# Altium PCB STM32H743I-EVAL2PCBDESIGN.PcbDoc (part 4 of 23)
Units mil, origin at the board's own origin, x right, y up, seen from the top; angles counter-clockwise.
Board outline 6558 x 5417 mil, 8 copper layers (L1_TOP, L2_GND, L3_HS1, L4_POWER, L5_SIG, L6_HS2, L7_GND, L8_BOTTOM), stack 61.368 mil thick; 620 components, 588 nets, 2945 pads, 1724 vias.
Unrouted connection lines stored in the file: 1.
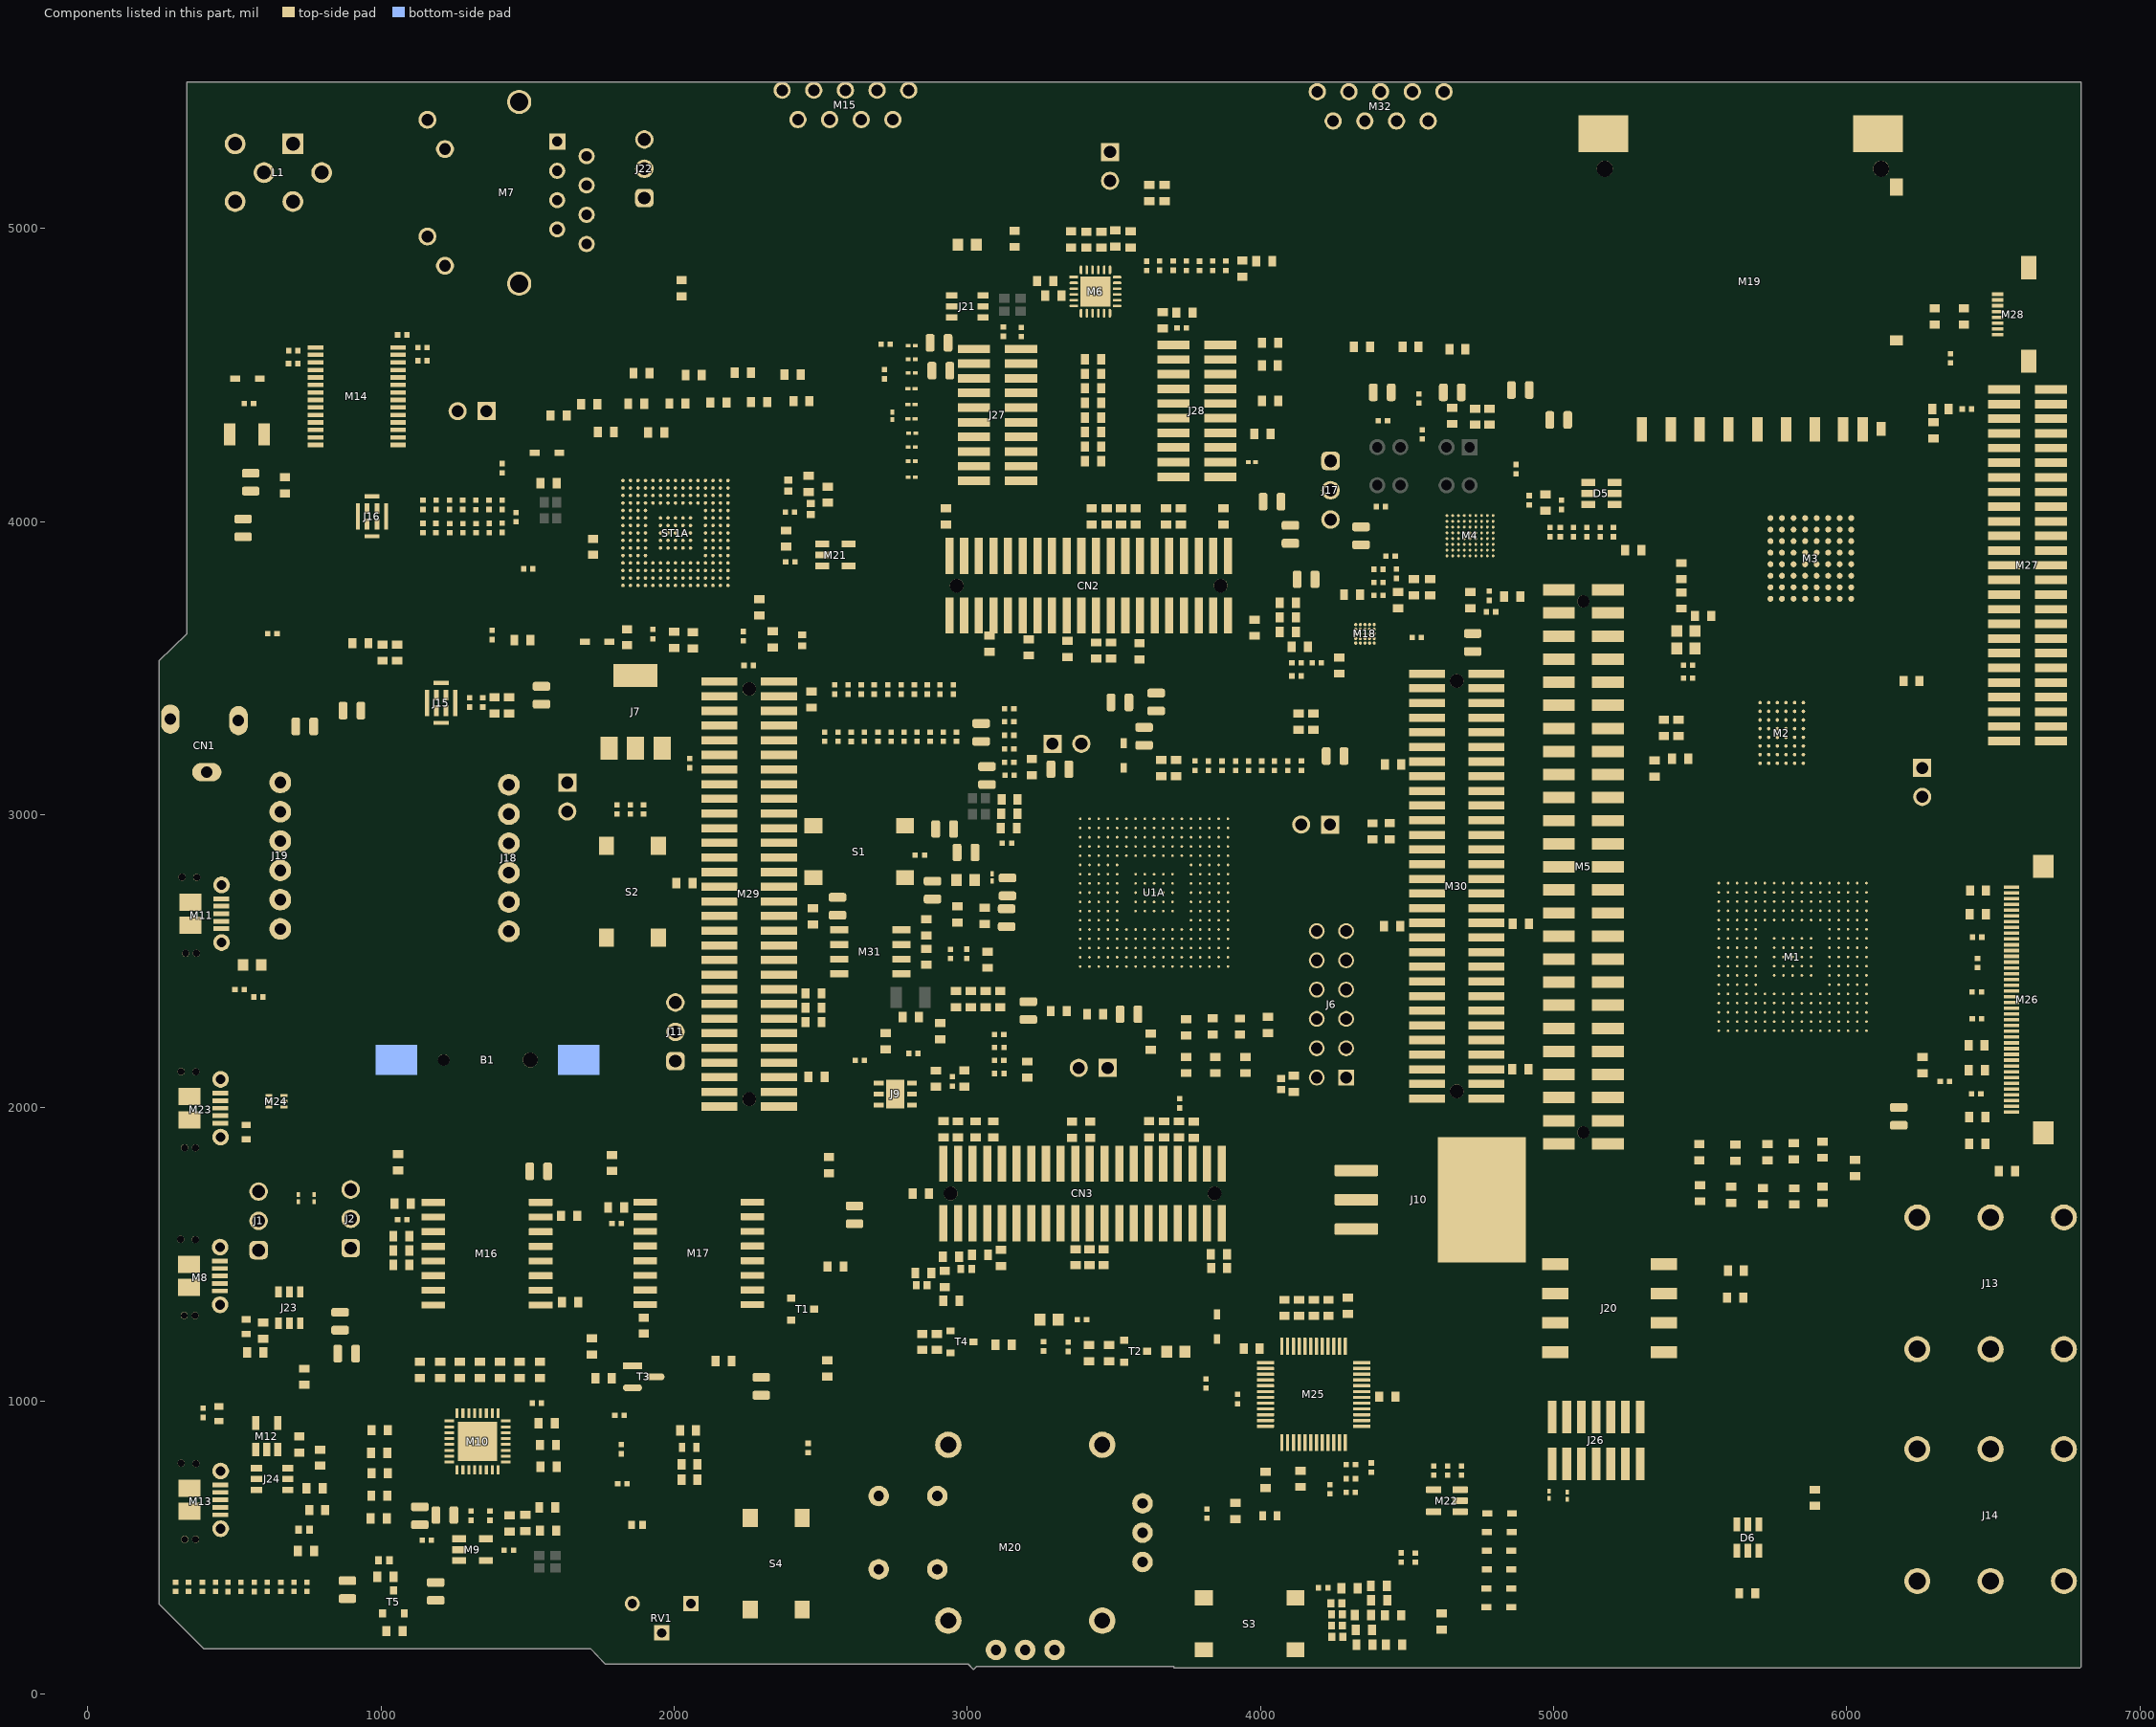
[diagram p8: the components of this part, seen from the top]

## Part data (continued)
CN1: library part PJ-102A, "2.0 x 6.5 mm, 2.5 A, Horizontal, Through Hole, Tapered Pins, Dc Power Jack Connector", Current Rating=2.5A, Manufacturer="Same Sky", Max Operating Temperature=85°C, Min Operating Temperature=-25°C, Supplier Part Number=CP-102A-ND, Voltage Rating=24V, Category="Power Connectors", ComponentLink1Description=https://datasheet.octopart.com:443/PJ-102A-Same-Sky-datasheet-184712293.pdf?src-supplier=Same+Sky, ComponentLink1URL=https://datasheet.octopart.com:443/PJ-102A-Same-Sky-datasheet-184712293.pdf?src-supplier=Same+Sky, ComponentLink2Description=https://datasheet.octopart.com:443/PJ-102A-Same-Sky-datasheet-181917428.pdf?src-supplier=Same+Sky, ComponentLink2URL=https://datasheet.octopart.com:443/PJ-102A-Same-Sky-datasheet-181917428.pdf?src-supplier=Same+Sky, ComponentLink3Description=https://datasheet.octopart.com:443/PJ-102A-CUI-Devices-datasheet-175924906.pdf?src-supplier=Same+Sky, ComponentLink3URL=https://datasheet.octopart.com:443/PJ-102A-CUI-Devices-datasheet-175924906.pdf?src-supplier=Same+Sky, ComponentLink4Description=https://datasheet.octopart.com:443/PJ-102A-CUI-Devices-datasheet-137942634.pdf?src-supplier=Same+Sky, ComponentLink4URL=https://datasheet.octopart.com:443/PJ-102A-CUI-Devices-datasheet-137942634.pdf?src-supplier=Same+Sky, ComponentLink5Description=https://datasheet.octopart.com:443/PJ-102A-CUI-Devices-datasheet-180437676.pdf?src-supplier=IHS, ComponentLink5URL=https://datasheet.octopart.com:443/PJ-102A-CUI-Devices-datasheet-180437676.pdf?src-supplier=IHS, ComponentLink6Description=https://datasheet.octopart.com:443/PJ-102A-Same-Sky-datasheet-190142001.pdf?src-supplier=element14+APAC, ComponentLink6URL=https://datasheet.octopart.com:443/PJ-102A-Same-Sky-datasheet-190142001.pdf?src-supplier=element14+APAC, ComponentLink7Description=https://datasheet.octopart.com:443/PJ-102A-Same-Sky-datasheet-182881007.pdf?src-supplier=Electro+Sonic, ComponentLink7URL=https://datasheet.octopart.com:443/PJ-102A-Same-Sky-datasheet-182881007.pdf?src-supplier=Electro+Sonic, ComponentLink8Description=https://datasheet.octopart.com:443/PJ-102A-CUI-Devices-datasheet-175925641.pdf?src-supplier=Master+Electronics, ComponentLink8URL=https://datasheet.octopart.com:443/PJ-102A-CUI-Devices-datasheet-175925641.pdf?src-supplier=Master+Electronics, ComponentLink9Description=https://datasheet.octopart.com:443/PJ-102A-CUI-Devices-datasheet-141000397.pdf?src-supplier=Master+Electronics, ComponentLink9URL=https://datasheet.octopart.com:443/PJ-102A-CUI-Devices-datasheet-141000397.pdf?src-supplier=Master+Electronics, ComponentLink10Description=https://datasheet.octopart.com:443/PJ-102A-CUI-Devices-datasheet-103112348.pdf?src-supplier=Master+Electronics, ComponentLink10URL=https://datasheet.octopart.com:443/PJ-102A-CUI-Devices-datasheet-103112348.pdf?src-supplier=Master+Electronics, ComponentLink11Description=https://datasheet.octopart.com:443/PJ-102A-Same-Sky-datasheet-189105345.pdf?src-supplier=Master+Electronics, ComponentLink11URL=https://datasheet.octopart.com:443/PJ-102A-Same-Sky-datasheet-189105345.pdf?src-supplier=Master+Electronics, ComponentLink12Description=https://datasheet.octopart.com:443/PJ-102A-Same-Sky-datasheet-182049957.pdf?src-supplier=Future+Electronics, ComponentLink12URL=https://datasheet.octopart.com:443/PJ-102A-Same-Sky-datasheet-182049957.pdf?src-supplier=Future+Electronics, ComponentLink13Description=https://datasheet.octopart.com:443/PJ-102A-CUI-Devices-datasheet-175923576.pdf?src-supplier=Future+Electronics, ComponentLink13URL=https://datasheet.octopart.com:443/PJ-102A-CUI-Devices-datasheet-175923576.pdf?src-supplier=Future+Electronics, ComponentLink14Description=https://datasheet.octopart.com:443/PJ-102A-CUI-Devices-datasheet-137760698.pdf?src-supplier=Future+Electronics, ComponentLink14URL=https://datasheet.octopart.com:443/PJ-102A-CUI-Devices-datasheet-137760698.pdf?src-supplier=Future+Electronics, ComponentLink15Description=https://datasheet.octopart.com:443/PJ-102A-CUI-Devices-datasheet-175927751.pdf?src-supplier=CUI+Devices+SCT, ComponentLink15URL=https://datasheet.octopart.com:443/PJ-102A-CUI-Devices-datasheet-175927751.pdf?src-supplier=CUI+Devices+SCT, ComponentLink16Description=https://datasheet.octopart.com:443/PJ-102A-CUI-Devices-datasheet-142371189.pdf?src-supplier=CUI+Devices+SCT, ComponentLink16URL=https://datasheet.octopart.com:443/PJ-102A-CUI-Devices-datasheet-142371189.pdf?src-supplier=CUI+Devices+SCT, ComponentLink17Description=https://octopart.com:443/opatz8j6/c1?t=-WF0T8sMxw7ZEMEUunYG0IGxKP0Yt_0ojUryTbX8oeEBMFzh7OEzvQ5wQ2oF7zRzJvMED2rYXCKHmgLGzpfqOZ8OAseJ3yb9j17F6kt0M6N8bppkurbud4uWSQiMY7p_M18UnyrmhLVNgvzFZ1aM8roWuABv1Z9PeQascFjjxp9w9dz_8rujgdZPrO9VPqPVryE0O_anSqoBvbz1cF4h_TZdQxegGvHhOW1RkBmlz1HnuA1vdZdAuZE1KP9yVeIohwCGcBivLgE_DLXZ4t2EhFAMCzvNBNZlDcn7hxFATuDh7xdDrbzepbH8VYiuF8uFnjZGJEdYMCOlNmv2cjiC_a3ntD-4&src-supplier=Compliance+Statements, ComponentLink17URL=https://octopart.com:443/opatz8j6/c1?t=-WF0T8sMxw7ZEMEUunYG0IGxKP0Yt_0ojUryTbX8oeEBMFzh7OEzvQ5wQ2oF7zRzJvMED2rYXCKHmgLGzpfqOZ8OAseJ3yb9j17F6kt0M6N8bppkurbud4uWSQiMY7p_M18UnyrmhLVNgvzFZ1aM8roWuABv1Z9PeQascFjjxp9w9dz_8rujgdZPrO9VPqPVryE0O_anSqoBvbz1cF4h_TZdQxegGvHhOW1RkBmlz1HnuA1vdZdAuZE1KP9yVeIohwCGcBivLgE_DLXZ4t2EhFAMCzvNBNZlDcn7hxFATuDh7xdDrbzepbH8VYiuF8uFnjZGJEdYMCOlNmv2cjiC_a3ntD-4&src-supplier=Compliance+Statements, ComponentLink18Description=https://octopart.com:443/opatz8j6/c1?t=lyDUh_qruL8vgWjpDY0KKH2CtWWc6dlzeBk5P2dQyiXtq9Y2eSRQ4w2SeffFeyNMAgU8S-1KL4yqldB-C-vOmkaRL93H8iYUZOfkDXFCyzrXyvYBlAPBl_LhZxhLQm8qUURGIUMzRwjiqq8UmUCclUmZ7fGkOUNp9q4-4o5nw8B7GTL2ll3kLVZ8Le9fQjCqhP5ynE6Niv_4rvp-t6Mf04GrG4xMvKFGRQXPrAF2WBA0qoirwf4qsfsiR40k2bgGowc35B1kWWo5x3WLNrL2hlbeGbH9PjGwaxTHZuUgy3hOjcfOu4X-01RnGaLVY6UUYiwk2OzDVnbYc9S-e4bOBtrgSdj_qTEg1w&src-supplier=Compliance+Statements, ComponentLink18URL=https://octopart.com:443/opatz8j6/c1?t=lyDUh_qruL8vgWjpDY0KKH2CtWWc6dlzeBk5P2dQyiXtq9Y2eSRQ4w2SeffFeyNMAgU8S-1KL4yqldB-C-vOmkaRL93H8iYUZOfkDXFCyzrXyvYBlAPBl_LhZxhLQm8qUURGIUMzRwjiqq8UmUCclUmZ7fGkOUNp9q4-4o5nw8B7GTL2ll3kLVZ8Le9fQjCqhP5ynE6Niv_4rvp-t6Mf04GrG4xMvKFGRQXPrAF2WBA0qoirwf4qsfsiR40k2bgGowc35B1kWWo5x3WLNrL2hlbeGbH9PjGwaxTHZuUgy3hOjcfOu4X-01RnGaLVY6UUYiwk2OzDVnbYc9S-e4bOBtrgSdj_qTEg1w&src-supplier=Compliance+Statements, ComponentLink19Description=https://octopart.com:443/opatz8j6/c1?t=MX50ZQ27usZ1VxyD64vtWuf1x5tTWh6F3_iRm8YsNBPZ3TY-RrHEHdvDhJxi5UpjlMh8i4bmZmEGPAUjLwa4lqmyce-7MTq-ZvaRW5pn234M0TG_mcIxVK-OqJeyQhim8KYk0XUkNHsspGqmdyslYYzUMiOyt7QwL4Ot-n6vBREdxxelS0PWZElcwtgiBtCki3KKuhbe8WbnnxWORkz0YnWONv3K2abevKLmNLsLM9defrcVQ6szAvcbWWMUqZlpy30zguDfA8WqSXd8kkt6_HsNVRXM7Cis3zZl-TqTGJ9QxoAvJvlt058ADETxR_dSbO61_SOvTk4UwzmRl2tF1SzK5TXb&src-supplier=Compliance+Statements, ComponentLink19URL=https://octopart.com:443/opatz8j6/c1?t=MX50ZQ27usZ1VxyD64vtWuf1x5tTWh6F3_iRm8YsNBPZ3TY-RrHEHdvDhJxi5UpjlMh8i4bmZmEGPAUjLwa4lqmyce-7MTq-ZvaRW5pn234M0TG_mcIxVK-OqJeyQhim8KYk0XUkNHsspGqmdyslYYzUMiOyt7QwL4Ot-n6vBREdxxelS0PWZElcwtgiBtCki3KKuhbe8WbnnxWORkz0YnWONv3K2abevKLmNLsLM9defrcVQ6szAvcbWWMUqZlpy30zguDfA8WqSXd8kkt6_HsNVRXM7Cis3zZl-TqTGJ9QxoAvJvlt058ADETxR_dSbO61_SOvTk4UwzmRl2tF1SzK5TXb&src-supplier=Compliance+Statements, ComponentLink20Description=https://octopart.com:443/opatz8j6/c1?t=5rpHqBocvOB8XETbdsaMT4GCschriLAbhsG7vJx1FlT8pBaX9iKLRk6_djNufPc8GbbK6GpUuau5DG13XQUYV21dqMdXNjQvh_aki5DezZmrMYht9EAvs-13CUEhlXsPKy8wn65mCshOJBhoF3j0qHXVBLctBvCgYs-NCYFeoCo82jHuZfZcLQhZqTWEr9MiSGXAp2yXBA9aQQkIS9heuOTPl2Xc5-Dpk6yEhoM21vz2YOp4cO-bRCz9NbrCyZ3GNzS48IIclIbWkup4Hr-2Vj8lAXYqtTWRShOCzDSQmNs71j2OYaC5ZUAsJeky8ABPYqCo5WYhqzkkssJsDXk0AAofsDmOPcr_rg&src-supplier=Compliance+Statements, ComponentLink20URL=https://octopart.com:443/opatz8j6/c1?t=5rpHqBocvOB8XETbdsaMT4GCschriLAbhsG7vJx1FlT8pBaX9iKLRk6_djNufPc8GbbK6GpUuau5DG13XQUYV21dqMdXNjQvh_aki5DezZmrMYht9EAvs-13CUEhlXsPKy8wn65mCshOJBhoF3j0qHXVBLctBvCgYs-NCYFeoCo82jHuZfZcLQhZqTWEr9MiSGXAp2yXBA9aQQkIS9heuOTPl2Xc5-Dpk6yEhoM21vz2YOp4cO-bRCz9NbrCyZ3GNzS48IIclIbWkup4Hr-2Vj8lAXYqtTWRShOCzDSQmNs71j2OYaC5ZUAsJeky8ABPYqCo5WYhqzkkssJsDXk0AAofsDmOPcr_rg&src-supplier=Compliance+Statements, Export Control Classification Number (ECCN) Code=EAR99, Harmonized Tariff Schedule (HTS) Code=8536.69.40.20, Inside Diameter=2mm, Introduction Date=2024-10-09, Lifecycle Status=Production, Manufacturer Part Number=PJ-102A, Mounting Technology="Through Hole", Number of Conductors=2, Orientation=Horizontal, Outside Diameter=6.5mm, Pins=2, Pricing="1=0.62, 10=0.526, 25=0.4932, 50=0.4698, 200=0.4259, 400=0.40553, 600=0.39408, 1000=0.38011, 2600=0.35532 (USD)", REACH SVHC=Yes, RoHS=Compliant, Schedule B="8536695050, 8536695050|8536695050, 8536695050|8536695050|8536695050, 8536695050|8536695050|8536695050|8536695050", Shielding=Unshielded, Stock=17846, Supplier=DigiKey, Termination=Solder, Voltage Rating (DC)=24V
CN2 CN3: "Pin Header, Board-to-Board, 3.8 A, 2 Rows, 40 Contacts, Surface Mount, FTR Series, Unshrouded", Manufacturer=Samtec, Manufacturer Lifecycle Status=PRODUCTION, Supplier Part Number=FTR-120-03-L-D-LC-ND, Category="Board to Board Connectors", ComponentLink1Description=https://datasheet.octopart.com:443/FTR-120-03-L-D-LC-Samtec-datasheet-97028732.pdf?src-supplier=Samtec, ComponentLink1URL=https://datasheet.octopart.com:443/FTR-120-03-L-D-LC-Samtec-datasheet-97028732.pdf?src-supplier=Samtec, ComponentLink2Description=https://sigma.octopart.com:443/97028733/technical_drawing/Samtec-FTR-120-03-L-D-LC.pdf?src-supplier=Samtec, ComponentLink2URL=https://sigma.octopart.com:443/97028733/technical_drawing/Samtec-FTR-120-03-L-D-LC.pdf?src-supplier=Samtec, ComponentLink3Description=https://datasheet.octopart.com:443/FTR-120-03-L-D-LC-Samtec-datasheet-118235237.pdf?src-supplier=Electro+Sonic, ComponentLink3URL=https://datasheet.octopart.com:443/FTR-120-03-L-D-LC-Samtec-datasheet-118235237.pdf?src-supplier=Electro+Sonic, ComponentLink4Description=https://datasheet.octopart.com:443/FTR-120-03-L-D-LC-Samtec-datasheet-151312691.pdf?src-supplier=Sager+Electronics, ComponentLink4URL=https://datasheet.octopart.com:443/FTR-120-03-L-D-LC-Samtec-datasheet-151312691.pdf?src-supplier=Sager+Electronics, Lifecycle Status=Production, Manufacturer Part Number=FTR-120-03-L-D-LC, Pricing="23=8.03739 (USD)", RoHS=Compliant, Supplier=DigiKey
D1 D3 D4 D14 D16 D17 D18 D19 D20 D21 D39: "Rectifier Diode, Schottky, 1 Phase, 1 Element, 3A, 10V V(RRM), Silicon", Average Rectified Current=3A, Forward Voltage=320mV, Manufacturer=STMicroelectronics, Max Forward Surge Current (Ifsm)=5A, Max Junction Temperature (Tj)=150°C, Max Power Dissipation=310mW, Max Repetitive Reverse Voltage (Vrrm)=10V, Max Reverse Leakage Current=7.5µA, Min Operating Temperature=-65°C, Peak Reverse Current=2.5µA, Supplier Part Number=497-3707-1-ND, Category="Schottky Diodes", China RoHS=Compliant, ComponentLink1Description=https://datasheet.octopart.com:443/BAT60JFILM-STMicroelectronics-datasheet-56177.pdf?src-supplier=STMicroelectronics, ComponentLink1URL=https://datasheet.octopart.com:443/BAT60JFILM-STMicroelectronics-datasheet-56177.pdf?src-supplier=STMicroelectronics, ComponentLink2Description=https://datasheet.octopart.com:443/BAT60JFILM-STMicroelectronics-datasheet-12532682.pdf?src-supplier=TME, ComponentLink2URL=https://datasheet.octopart.com:443/BAT60JFILM-STMicroelectronics-datasheet-12532682.pdf?src-supplier=TME, ComponentLink3Description=https://datasheet.octopart.com:443/BAT60JFILM-STMicroelectronics-datasheet-181242469.pdf?src-supplier=Newark, ComponentLink3URL=https://datasheet.octopart.com:443/BAT60JFILM-STMicroelectronics-datasheet-181242469.pdf?src-supplier=Newark, ComponentLink4Description=https://datasheet.octopart.com:443/BAT60JFILM-STMicroelectronics-datasheet-14054140.pdf?src-supplier=iiiC, ComponentLink4URL=https://datasheet.octopart.com:443/BAT60JFILM-STMicroelectronics-datasheet-14054140.pdf?src-supplier=iiiC, Contact Plating=Tin, Country of Origin="Mainland China", Current Rating=3A, Element Configuration=Single, Export Control Classification Number (ECCN) Code=EAR99, Forward Current=3A, Harmonized Tariff Schedule (HTS) Code=8541.10.00.80, Height=1.17mm, Introduction Date=1980-01-06, Lead Free="Lead Free", Length=1.8mm, Lifecycle Status=Production, Manufacturer Part Number=BAT60JFILM, Max Operating Temperature=150°C, Max Output current=3A, Max Reverse Voltage (DC)=10V, Max Surge Current=5A, Mounting Technology="Surface Mount", Number of Elements=1, Number of Terminals=2, Output Current=3A, Packaging="Tape and Reel", Peak Non-Repetitive Surge Current=5A, Pins=2, Polarity=Standard, Pricing="1=0.37, 10=0.224, 50=0.1612, 100=0.1405, 500=0.10406 (USD)", Radiation Hardening=No, REACH SVHC=Yes, Reverse Standoff Voltage=10V, RoHS=Compliant, Schedule B="8541100080, 8541100080|8541100080|8541100080|8541100080|8541100080|8541100080|8541100080|8541100080|8541100080|8541100080|8541100080|8541100080|8541100080|8541100080|8541100080|8541100080|8541100080|8541100080|8541100080|8541100080|8541100080|8541100080|8541100080|85", Supplier=DigiKey, Voltage Rating (DC)=10V, Weight=4.535924g, Width=1.45mm
D2: "20W 6.1V 6.1V 3V 0201 ESD and Surge Protection (TVS/ESD) ROHS", Breakdown Voltage=7.05V, Case Code (Imperial)=0201, Case/Package=SMD/SMT, Clamping Voltage=21V, Leakage Current=100nA, Manufacturer=STMicroelectronics, Max Breakdown Voltage=8V, Max Junction Temperature (Tj)=125°C, Max Power Dissipation=20W, Max Repetitive Reverse Voltage (Vrrm)=3V, Min Breakdown Voltage=6.1V, Min Operating Temperature=-40°C, Peak Pulse Current=2A, Power Line Protection=No, Supplier Part Number=497-8752-6-ND, Test Current=1mA, Category="TVS Diodes", China RoHS=Compliant, ComponentLink1Description=https://datasheet.octopart.com:443/ESDALC6V1-1U2-STMicroelectronics-datasheet-10838532.pdf?src-supplier=Newark, ComponentLink1URL=https://datasheet.octopart.com:443/ESDALC6V1-1U2-STMicroelectronics-datasheet-10838532.pdf?src-supplier=Newark, ComponentLink2Description=https://datasheet.octopart.com:443/ESDALC6V1-1U2-STMicroelectronics-datasheet-62332579.pdf?src-supplier=TME, ComponentLink2URL=https://datasheet.octopart.com:443/ESDALC6V1-1U2-STMicroelectronics-datasheet-62332579.pdf?src-supplier=TME, ComponentLink3Description=https://datasheet.octopart.com:443/ESDALC6V1-1U2-STMicroelectronics-datasheet-10468883.pdf?src-supplier=STMicroelectronics, ComponentLink3URL=https://datasheet.octopart.com:443/ESDALC6V1-1U2-STMicroelectronics-datasheet-10468883.pdf?src-supplier=STMicroelectronics, ComponentLink4Description=https://datasheet.octopart.com:443/ESDALC6V1-1U2-STMicroelectronics-datasheet-62305152.pdf?src-supplier=Newchip+Electronics+Limited, ComponentLink4URL=https://datasheet.octopart.com:443/ESDALC6V1-1U2-STMicroelectronics-datasheet-62305152.pdf?src-supplier=Newchip+Electronics+Limited, ComponentLink5Description=https://datasheet.octopart.com:443/ESDALC6V1-1U2-STMicroelectronics-datasheet-14047825.pdf?src-supplier=iiiC, ComponentLink5URL=https://datasheet.octopart.com:443/ESDALC6V1-1U2-STMicroelectronics-datasheet-14047825.pdf?src-supplier=iiiC, ComponentLink6Description=https://datasheet.octopart.com:443/ESDALC6V1-1U2-STMicroelectronics-datasheet-8372218.pdf?src-supplier=Farnell, ComponentLink6URL=https://datasheet.octopart.com:443/ESDALC6V1-1U2-STMicroelectronics-datasheet-8372218.pdf?src-supplier=Farnell, Composition=Zener, Country of Origin="Mainland China", Depth=300µm, Direction=Unidirectional, Element Configuration=Single, ESD Protection=Yes, Export Control Classification Number (ECCN) Code=EAR99, Harmonized Tariff Schedule (HTS) Code=8541.10.00.50, Height=330µm, Introduction Date=2008-10-13, Lead Free="Lead Free", Length=600µm, Lifecycle Status=Obsolete, Manufacturer Part Number=ESDALC6V1-1U2, Max Operating Temperature=125°C, Max Reverse Leakage Current=100nA, Mounting Technology="Surface Mount", Number of Channels=1, Number of Elements=1, Number of Terminals=2, Number of Unidirectional Channels=1, Peak Pulse Power=20W, Peak Reverse Current=100nA, Pins=2, Polarity=Unidirectional, Power Dissipation=20W, Radiation Hardening=No, REACH SVHC=Yes, Reverse Breakdown Voltage=6.1V, Reverse Standoff Voltage=3V, RoHS=Compliant, Schedule B="8536300000, 8536300000|8536300000|8536300000|8536300000|8536300000|8536300000|8536300000|8536300000|8536300000|8536300000|8536300000|8536300000|8536300000|8536300000|8536300000|8536300000|8536300000|8536300000|8536300000|8536300000|8536300000|8536300000|8536300000|85", Stock=32310, Supplier=DigiKey, Termination=SMD/SMT, Width=350µm
D5 D6: "Tvs Diodes & Esd Suppressors; ESDA6V1BC6; Stmicroelectronics; 5 V; 6; 11.35 V; 6.1 V", Breakdown Voltage=7.05V, Case/Package=SOT-23, Clamping Voltage=11.35V, Leakage Current=1µA, Manufacturer=STMicroelectronics, Max Breakdown Voltage=8V, Max Junction Temperature (Tj)=150°C, Max Power Dissipation=80W, Max Repetitive Reverse Voltage (Vrrm)=5V, Min Breakdown Voltage=6.1V, Min Operating Temperature=-40°C, Peak Pulse Current=3A, Power Line Protection=No, Supplier Part Number=497-6635-1-ND, Test Current=1mA, Category="TVS Diodes", China RoHS=Compliant, ComponentLink1Description=https://datasheet.octopart.com:443/ESDA6V1BC6-STMicroelectronics-datasheet-62332559.pdf?src-supplier=TME, ComponentLink1URL=https://datasheet.octopart.com:443/ESDA6V1BC6-STMicroelectronics-datasheet-62332559.pdf?src-supplier=TME, ComponentLink2Description=https://datasheet.octopart.com:443/ESDA6V1BC6-STMicroelectronics-datasheet-23376.pdf?src-supplier=Components+Direct, ComponentLink2URL=https://datasheet.octopart.com:443/ESDA6V1BC6-STMicroelectronics-datasheet-23376.pdf?src-supplier=Components+Direct, ComponentLink3Description=https://datasheet.octopart.com:443/ESDA6V1BC6-STMicroelectronics-datasheet-158727008.pdf?src-supplier=Newchip+Electronics+Limited, ComponentLink3URL=https://datasheet.octopart.com:443/ESDA6V1BC6-STMicroelectronics-datasheet-158727008.pdf?src-supplier=Newchip+Electronics+Limited, ComponentLink4Description=https://datasheet.octopart.com:443/ESDA6V1BC6-STMicroelectronics-datasheet-14049101.pdf?src-supplier=iiiC, ComponentLink4URL=https://datasheet.octopart.com:443/ESDA6V1BC6-STMicroelectronics-datasheet-14049101.pdf?src-supplier=iiiC, Composition=Zener, Country of Origin="Mainland China", Depth=1.75mm, Direction=Bidirectional, ESD Protection=Yes, Export Control Classification Number (ECCN) Code=EAR99, Harmonized Tariff Schedule (HTS) Code=8541.10.00.50, Height=1.45mm, Introduction Date=1980-01-04, Lead Free="Lead Free", Length=3.05mm, Lifecycle Status=Production, Manufacturer Part Number=ESDA6V1BC6, Max Operating Temperature=150°C, Max Reverse Leakage Current=1µA, Mounting Technology="Surface Mount", Number of Bidirectional Channels=4, Number of Channels=4, Number of Elements=4, Number of Terminals=6, Operating Supply Voltage=5V, Peak Pulse Power=80W, Peak Reverse Current=1µA, Pins=6, Polarity=Bidirectional, Power Rating=80W, Pricing="1=0.52, 10=0.321, 50=0.2322, 100=0.2033, 500=0.15238 (USD)", Radiation Hardening=No, REACH SVHC=Yes, Reverse Breakdown Voltage=6.1V, Reverse Standoff Voltage=5V, RoHS=Compliant, Schedule B="8536300000, 8536300000|8536300000|8536300000|8536300000|8536300000", Stock=40863, Supplier=DigiKey, Termination=SMD/SMT, Voltage Rating (DC)=6.1V, Width=1.75mm, Working Voltage=5V
D7 D10 D11 D12 D22: "ESDA Series 6.4 V 700 W SMT Uni-Directional TVS Diode - 1610", Breakdown Voltage=6.8V, Case/Package=1610, Clamping Voltage=11.6V, Manufacturer=STMicroelectronics, Max Breakdown Voltage=7.2V, Max Junction Temperature (Tj)=150°C, Min Breakdown Voltage=6.4V, Min Operating Temperature=-55°C, Peak Pulse Current=60A, Peak Pulse Power=700W, Peak Reverse Current=200nA, Power Line Protection=No, Reverse Standoff Voltage=5V, Supplier Part Number=497-16253-6-ND, Category="TVS Diodes", China RoHS=Compliant, ComponentLink1Description=https://datasheet.octopart.com:443/ESDA7P60-1U1M-STMicroelectronics-datasheet-62313013.pdf?src-supplier=Upverter, ComponentLink1URL=https://datasheet.octopart.com:443/ESDA7P60-1U1M-STMicroelectronics-datasheet-62313013.pdf?src-supplier=Upverter, ComponentLink2Description=https://datasheet.octopart.com:443/ESDA7P60-1U1M-STMicroelectronics-datasheet-34136856.pdf?src-supplier=STMicroelectronics, ComponentLink2URL=https://datasheet.octopart.com:443/ESDA7P60-1U1M-STMicroelectronics-datasheet-34136856.pdf?src-supplier=STMicroelectronics, Composition=Zener, Country of Origin="Mainland China", Direction=Unidirectional, Export Control Classification Number (ECCN) Code=EAR99, Harmonized Tariff Schedule (HTS) Code=8541.10.00.50, Height=650µm, Introduction Date=2014-11-14, Lifecycle Status=Production, Manufacturer Part Number=ESDA7P60-1U1M, Max Operating Temperature=150°C, Mounting Technology="Surface Mount", Number of Channels=1, Number of Elements=1, Number of Terminals=2, Number of Unidirectional Channels=1, Pins=2, Polarity=Unidirectional, Pricing="1=0.54, 10=0.33, 50=0.2392, 100=0.2096, 500=0.15722 (USD)", REACH SVHC=Yes, RoHS=Compliant, Schedule B="8536300000, 8536300000|8536300000, 8536300000|8536300000|8536300000, 8536300000|8536300000|8536300000|8536300000", Stock=60851, Supplier=DigiKey
D8 D9 D13 D15: "LED Uni-Color Super Red 639nm 2-Pin Chip 0402(1006Metric) T/R"
D23 D24 D25 D26 D27 D28 D29 D30 D31 D32 D33 D34 D35 D36 D37 D38: "1A@8/20us 6V 18W 6V 3V 0201 ESD and Surge Protection (TVS/ESD) ROHS", Breakdown Voltage=6V, Case Code (Imperial)=0201, Clamping Voltage=13V, Leakage Current=100nA, Manufacturer=STMicroelectronics, Max Operating Temperature=150°C, Max Power Dissipation=18W, Max Repetitive Reverse Voltage (Vrrm)=3V, Max Surge Current=1.4A, Min Operating Temperature=-40°C, Peak Pulse Current=1A, Power Line Protection=No, Supplier Part Number=497-ESDAULC6-1U2CT-ND, Case/Package=0201, Category="TVS Diodes", China RoHS=Compliant, ComponentLink1Description=https://datasheet.octopart.com:443/ESDAULC6-1U2-STMicroelectronics-datasheet-16346873.pdf?src-supplier=Newark, ComponentLink1URL=https://datasheet.octopart.com:443/ESDAULC6-1U2-STMicroelectronics-datasheet-16346873.pdf?src-supplier=Newark, Composition=Zener, Country of Origin="Mainland China", Depth=300µm, Direction=Unidirectional, Element Configuration=Single, ESD Protection=Yes, Export Control Classification Number (ECCN) Code=EAR99, Harmonized Tariff Schedule (HTS) Code=8541.10.00.50, Height=330µm, Introduction Date=2012-06-05, Length=600µm, Lifecycle Status=Obsolete, LTB Date=2025-06-18, LTD Date=2025-12-18, Manufacturer Part Number=ESDAULC6-1U2, Max Reverse Leakage Current=100nA, Min Breakdown Voltage=6V, Mounting Technology="Surface Mount", Number of Channels=1, Number of Elements=1, Number of Terminals=2, Number of Unidirectional Channels=1, Packaging="Cut Tape", Peak Pulse Power=18W, Peak Reverse Current=100nA, Pins=2, Polarity=Unidirectional, Pricing="1=0.34, 10=0.209, 50=0.1502, 100=0.131, 500=0.0968 (USD)", Radiation Hardening=No, REACH SVHC=Yes, Reverse Standoff Voltage=3V, RoHS=Compliant, Stock=38212, Supplier=DigiKey, Termination=SMD/SMT, Width=350µm
F1: library part 0ZCJ0010FF2E, "Polymeric PTC Resettable Fuse 60V 100 mA Ih Surface Mount 1206 (3216 Metric)", Case Code (Imperial)=1206, Case Code (Metric)=3216, Current Rating=10A, Hold Current=100mA, Manufacturer="Bel Fuse", Max Operating Temperature=85°C, Max Voltage Rating (DC)=60V, Maximum Resistance 1 Hour (R1max)=15Ω, Min Operating Temperature=-40°C, Power Dissipation=400mW, Ratings="AEC-Q200, TUV", Supplier Part Number=5923-0ZCJ0010FF2EDKR-ND, Trip Current=250mA, Approvals="TUV, UL", Case/Package=1206, Category="PTC Resettable Fuses", China RoHS=Compliant, ComponentLink1Description=https://datasheet.octopart.com:443/0ZCJ0010FF2E-Bel-Fuse-datasheet-182141362.pdf?src-supplier=IHS, ComponentLink1URL=https://datasheet.octopart.com:443/0ZCJ0010FF2E-Bel-Fuse-datasheet-182141362.pdf?src-supplier=IHS, ComponentLink2Description=https://datasheet.octopart.com:443/0ZCJ0010FF2E-Bel-Fuse-datasheet-137696978.pdf?src-supplier=Farnell, ComponentLink2URL=https://datasheet.octopart.com:443/0ZCJ0010FF2E-Bel-Fuse-datasheet-137696978.pdf?src-supplier=Farnell, ComponentLink3Description=https://datasheet.octopart.com:443/0ZCJ0010FF2E-Bel-Fuse-datasheet-102831406.pdf?src-supplier=Sager+Electronics, ComponentLink3URL=https://datasheet.octopart.com:443/0ZCJ0010FF2E-Bel-Fuse-datasheet-102831406.pdf?src-supplier=Sager+Electronics, ComponentLink4Description=https://datasheet.octopart.com:443/0ZCJ0010FF2E-Bel-Fuse-datasheet-154728314.pdf?src-supplier=Electro+Sonic, ComponentLink4URL=https://datasheet.octopart.com:443/0ZCJ0010FF2E-Bel-Fuse-datasheet-154728314.pdf?src-supplier=Electro+Sonic, Contact Plating=Tin, Export Control Classification Number (ECCN) Code=EAR99, Harmonized Tariff Schedule (HTS) Code=8533.40.80.70, Height=850µm, Introduction Date=2013-04-06, Lead Free="Lead Free", Length=3.5mm, Lifecycle Status=Production, Manufacturer Part Number=0ZCJ0010FF2E, Max Current Rating=10A, Mounting Technology="Surface Mount", Number of Terminals=2, Packaging="Tape & Reel (TR)", Pricing="1=0.21, 5=0.172, 10=0.158, 50=0.1314, 100=0.1213, 250=0.10904, 500=0.1006, 1000=0.09279 (USD)", REACH SVHC=Yes, RoHS=Compliant, Schedule B=8533290000|8533290000|8533290000|8533290000|8533290000|8533290000|8533290000|8533290000|8533290000|8533290000|8533290000|8533290000|8533290000|8533290000|8533290000|8533290000|8533290000|8533290000|8533290000|8533290000|8533290000|8533290000|8533290000|85, Stock=718668, Supplier=DigiKey, Time to Trip=1s, Voltage Rating=60V, Width=1.8mm, Working Voltage=60V
J1 J2 J11 J17 J22: "WR-PHD Straight Male, PCB Header, Through Hole, 1 Rows, 3 Contacts, 2.54mm Pitch", Color=Black, Contact Resistance=20mΩ, Current Rating=3A, Insulation Resistance=1GΩ, Manufacturer="Wurth Elektronik", Manufacturer Lifecycle Status=ACTIVE, Max Operating Temperature=105°C, Min Operating Temperature=-40°C, Operating Supply Voltage=250V, Supplier Part Number=732-5316-ND, Category="Headers and Wire Housings", ComponentLink1Description=https://datasheet.octopart.com:443/61300311121-Wurth-Elektronik-datasheet-168684096.pdf?src-supplier=Wurth+Elektronik, ComponentLink1URL=https://datasheet.octopart.com:443/61300311121-Wurth-Elektronik-datasheet-168684096.pdf?src-supplier=Wurth+Elektronik, ComponentLink2Description=https://datasheet.octopart.com:443/61300311121-W%C3%BCrth-Elektronik-datasheet-44382959.pdf?src-supplier=Future+Electronics, ComponentLink2URL=https://datasheet.octopart.com:443/61300311121-W%C3%BCrth-Elektronik-datasheet-44382959.pdf?src-supplier=Future+Electronics, ComponentLink3Description=https://datasheet.octopart.com:443/61300311121-W%C3%BCrth-Elektronik-datasheet-149524047.pdf?src-supplier=Farnell, ComponentLink3URL=https://datasheet.octopart.com:443/61300311121-W%C3%BCrth-Elektronik-datasheet-149524047.pdf?src-supplier=Farnell, ComponentLink4Description=https://datasheet.octopart.com:443/61300311121-W%C3%BCrth-Elektronik-datasheet-21154836.pdf?src-supplier=element14+APAC, ComponentLink4URL=https://datasheet.octopart.com:443/61300311121-W%C3%BCrth-Elektronik-datasheet-21154836.pdf?src-supplier=element14+APAC, ComponentLink5Description=https://datasheet.octopart.com/613-003-111-21-W%C3%BCrth-Elektronik-datasheet-134615323.pdf, ComponentLink5URL=https://datasheet.octopart.com/613-003-111-21-W%C3%BCrth-Elektronik-datasheet-134615323.pdf, Connector Type="Male Pin", Contact Material=Gold, Contact Mating Length=5.9944mm, Contact Plating=Gold, Gender=Male, Height=8.94mm, Lead Free="Lead Free", Lead Pitch=2.54mm, Length=7.62mm, Lifecycle Status=Production, Manufacturer Part Number=61300311121, Mounting Technology="Through Hole", Number of Contacts=3, Number of Positions=3, Number of Rows=1, Orientation=Vertical, Packaging=Bulk, Pins=3, Pitch=2.54mm, Pricing="1=0.13, 10=0.113, 25=0.094, 50=0.0798 (USD)", RoHS=Compliant, Stock=188859, Supplier=DigiKey, Termination=Solder, Voltage Rating=250V, YEOL="1 = Estimated lifetime > 10 years"
J3 J4 J5 J8 J12 J25 J29: library part 10129378-902003BLF, "Pin Header, Board-to-Board, 2.54 mm, 1 Rows, 2 Contacts, Through Hole Straight, FCI Econostik", Color=Black, Contact Resistance=20mΩ, Current Rating=3A, Dielectric Material=Polyethylene, Insulation Resistance=5GΩ, Manufacturer="Amphenol Communications Solutions", Max Operating Temperature=105°C, Min Operating Temperature=-55°C, Operating Force=2.5N, Supplier Part Number=10129378-902003BLF-ND, Category="Card Edge Connectors", China RoHS=Compliant, ComponentLink1Description=https://datasheet.octopart.com:443/10129378-902003BLF-Amphenol-Communications-Solutions-datasheet-168215082.pdf?src-supplier=IHS, ComponentLink1URL=https://datasheet.octopart.com:443/10129378-902003BLF-Amphenol-Communications-Solutions-datasheet-168215082.pdf?src-supplier=IHS, ComponentLink2Description=https://datasheet.octopart.com:443/10129378-902003BLF-Amphenol-Communications-Solutions-datasheet-182900135.pdf?src-supplier=JRH+Electronics, ComponentLink2URL=https://datasheet.octopart.com:443/10129378-902003BLF-Amphenol-Communications-Solutions-datasheet-182900135.pdf?src-supplier=JRH+Electronics, ComponentLink3Description=https://datasheet.octopart.com:443/10129378-902003BLF-ICC-datasheet-100454231.pdf?src-supplier=Newark, ComponentLink3URL=https://datasheet.octopart.com:443/10129378-902003BLF-ICC-datasheet-100454231.pdf?src-supplier=Newark, Export Control Classification Number (ECCN) Code=EAR99, Gender=Male, Harmonized Tariff Schedule (HTS) Code=8536.69.40.40, Insulation Color=Black, Introduction Date=2014-08-14, Lifecycle Status=Production, Manufacturer Part Number=10129378-902003BLF, Number of Positions=2, Number of Rows=1, Orientation=Straight, Pins=2, Pitch=2.54mm, Pricing="1=0.22, 10=0.189, 100=0.1601, 500=0.14292, 1000=0.13608, 5000=0.12146, 10000=0.11566 (USD)", REACH SVHC=Yes, RoHS=Compliant, Stock=81719, Supplier=DigiKey, Terminal Pitch=2.54mm, Termination=Solder
J6: library part HEADER, "HEADER"
J7: "LD1117 Series 1300 mA 1.8 V Fixed Output Positive Voltage LDO Regulator- SOT-223", Case/Package=SOP, Dropout Voltage=1.1V, Input Bias Current=5mA, Manufacturer=STMicroelectronics, Max Junction Temperature (Tj)=125°C, Max Output current=1.3A, Max Power Dissipation=12W, Max Supply Voltage=15V, Min Input Voltage=3.3V, Min Operating Temperature=0°C, Min Output Voltage=1.8V, Output Current=800mA, Output Voltage Accuracy=1%, Supplier Part Number=497-7308-1-ND, Voltage Tolerance=2%, Accuracy=1%, Category="LDO Voltage Regulators", China RoHS=Compliant, ComponentLink1Description=https://datasheet.octopart.com:443/LD1117S18TR-STMicroelectronics-datasheet-21631343.pdf?src-supplier=Augswan, ComponentLink1URL=https://datasheet.octopart.com:443/LD1117S18TR-STMicroelectronics-datasheet-21631343.pdf?src-supplier=Augswan, ComponentLink2Description=https://datasheet.octopart.com:443/LD1117S18TR-STMicroelectronics-datasheet-10835789.pdf?src-supplier=Future+Electronics, ComponentLink2URL=https://datasheet.octopart.com:443/LD1117S18TR-STMicroelectronics-datasheet-10835789.pdf?src-supplier=Future+Electronics, ComponentLink3Description=https://datasheet.octopart.com:443/LD1117S18TR-STMicroelectronics-datasheet-10390305.pdf?src-supplier=Future+Electronics, ComponentLink3URL=https://datasheet.octopart.com:443/LD1117S18TR-STMicroelectronics-datasheet-10390305.pdf?src-supplier=Future+Electronics, ComponentLink4Description=https://datasheet.octopart.com:443/LD1117S18TR-STMicroelectronics-datasheet-10544930.pdf?src-supplier=Future+Electronics, ComponentLink4URL=https://datasheet.octopart.com:443/LD1117S18TR-STMicroelectronics-datasheet-10544930.pdf?src-supplier=Future+Electronics, ComponentLink5Description=https://datasheet.octopart.com:443/LD1117S18TR-STMicroelectronics-datasheet-12512609.pdf?src-supplier=STMicroelectronics, ComponentLink5URL=https://datasheet.octopart.com:443/LD1117S18TR-STMicroelectronics-datasheet-12512609.pdf?src-supplier=STMicroelectronics, ComponentLink6Description=https://datasheet.octopart.com:443/LD1117S18TR-STMicroelectronics-datasheet-140259827.pdf?src-supplier=Farnell, ComponentLink6URL=https://datasheet.octopart.com:443/LD1117S18TR-STMicroelectronics-datasheet-140259827.pdf?src-supplier=Farnell, ComponentLink7Description=https://datasheet.octopart.com:443/LD1117S18TR-STMicroelectronics-datasheet-39139416.pdf?src-supplier=element14+APAC, ComponentLink7URL=https://datasheet.octopart.com:443/LD1117S18TR-STMicroelectronics-datasheet-39139416.pdf?src-supplier=element14+APAC, ComponentLink8Description=https://datasheet.octopart.com:443/LD1117S18TR-STMicroelectronics-datasheet-14168930.pdf?src-supplier=iiiC, ComponentLink8URL=https://datasheet.octopart.com:443/LD1117S18TR-STMicroelectronics-datasheet-14168930.pdf?src-supplier=iiiC, Country of Origin="Mainland China", Export Control Classification Number (ECCN) Code=EAR99, Harmonized Tariff Schedule (HTS) Code=8542.39.00.60, Height=1.8mm, Height - Seated (Max)=1.9mm, Introduction Date=1980-01-04, Lead Free="Lead Free", Length=6.5mm, Lifecycle Status=Production, Manufacturer Part Number=LD1117S18TR, Max Operating Temperature=125°C, Mounting Technology="Surface Mount", Nominal Output Voltage=1.8V, Number of Channels=1, Number of Circuits=1, Number of Outputs=1, Number of Regulators=1, Number of Terminals=4, Output Type=Fixed, Output Voltage=1.8V, Packaging="Tape and Reel", Polarity=Positive, Power Dissipation=12W, Pricing="1=0.5, 10=0.349, 25=0.3116, 100=0.2707, 250=0.25108, 500=0.23926, 1000=0.22955 (USD)", Quiescent Current=5mA, Radiation Hardening=No, REACH SVHC=Yes, RoHS=Compliant, Schedule B=8542390000, Stock=14058, Supplier=DigiKey, Terminal Pitch=2.3mm, Width=3.5mm
J9: "ST1L05 Series 1.8 V 1.3 A Very Low Quiescent BiCMOS Voltage Regulator - DFN-6", Case/Package=DFN, Dropout Voltage=300mV, Manufacturer=STMicroelectronics, Max Junction Temperature (Tj)=125°C, Max Output current=1.3A, Max Supply Voltage=5.5V, Min Input Voltage=3V, Min Operating Temperature=0°C, Min Output Voltage=1.8V, Output Voltage Accuracy=2%, Power Supply Rejection Ratio (PSRR)=72dB, Quiescent Current=500µA, Supplier Part Number=497-6829-1-ND, Voltage Tolerance=3%, Accuracy=2%, Category="LDO Voltage Regulators", China RoHS=Compliant, ComponentLink1Description=https://datasheet.octopart.com:443/ST1L05BPUR-STMicroelectronics-datasheet-62334671.pdf?src-supplier=HQonline, ComponentLink1URL=https://datasheet.octopart.com:443/ST1L05BPUR-STMicroelectronics-datasheet-62334671.pdf?src-supplier=HQonline, ComponentLink2Description=https://datasheet.octopart.com:443/ST1L05BPUR-STMicroelectronics-datasheet-8328166.pdf?src-supplier=Upverter, ComponentLink2URL=https://datasheet.octopart.com:443/ST1L05BPUR-STMicroelectronics-datasheet-8328166.pdf?src-supplier=Upverter, ComponentLink3Description=https://datasheet.octopart.com:443/ST1L05BPUR-STMicroelectronics-datasheet-12527763.pdf?src-supplier=Upverter, ComponentLink3URL=https://datasheet.octopart.com:443/ST1L05BPUR-STMicroelectronics-datasheet-12527763.pdf?src-supplier=Upverter, ComponentLink4Description=https://datasheet.octopart.com:443/ST1L05BPUR-STMicroelectronics-datasheet-8103074.pdf?src-supplier=Verical, ComponentLink4URL=https://datasheet.octopart.com:443/ST1L05BPUR-STMicroelectronics-datasheet-8103074.pdf?src-supplier=Verical, Country of Origin=Malaysia, Export Control Classification Number (ECCN) Code=EAR99, Harmonized Tariff Schedule (HTS) Code=8542.39.00.60, Height - Seated (Max)=1mm, Introduction Date=2008-02-29, Lead Free="Lead Free", Length=3mm, Lifecycle Status=Production, Manufacturer Part Number=ST1L05BPUR, Max Operating Temperature=125°C, Min Current Limit=1.3A, Mounting Technology="Surface Mount", Number of Channels=1, Number of Circuits=1, Number of Outputs=1, Number of Regulators=1, Number of Terminals=6, Output Current=1.3A, Output Type=Adjustable, Output Voltage=5.5V, Pins=6, Polarity=Positive, Pricing="1=1.37, 10=0.993, 25=0.8992, 100=0.7957, 250=0.74636, 500=0.71658, 1000=0.70402 (USD)", Radiation Hardening=No, REACH SVHC=Yes, RoHS=Compliant, Schedule B="8542390000, 8542390000|8542390000|8542390000|8542390000|8542390000", Stock=28778, Supplier=DigiKey, Terminal Pitch=950µm, Width=3mm
J10: "5.5-A, 29-V, linear voltage regulator 3-DDPAK/TO-263 -40 to 125", Case/Package=TO-263, Dropout Voltage=1.3V, Manufacturer="Texas Instruments", Manufacturer Lifecycle Status=ACTIVE, Max Operating Temperature=125°C, Max Output current=5A, Max Power Dissipation=30W, Max Supply Voltage=27V, Min Current Limit=5.5A, Min Input Voltage=2.6V, Min Operating Temperature=-40°C, Output Voltage=3.3V, Quiescent Current=5mA, Supplier Part Number=296-35390-2-ND, Category="LDO Voltage Regulators", ComponentLink1Description=https://datasheet.octopart.com:443/LM1084ISX-3.3-NOPB-Texas-Instruments-datasheet-36834603.pdf?src-supplier=Texas+Instruments, ComponentLink1URL=https://datasheet.octopart.com:443/LM1084ISX-3.3-NOPB-Texas-Instruments-datasheet-36834603.pdf?src-supplier=Texas+Instruments, ComponentLink2Description=https://octopart.com:443/opatz8j6/c1?t=XjPZ95mwaTuyaopVPwYB-vAuTeLk9BdhXHpXRPpLoV7heq6jfKs6zbUbW_c3_E_s_SMPFwyFt2APWPIBGw399bfgzDnJc31p7RbXS8BrTcreve7C5jgqypnrERusi7yCRPQ7-IOmBrwl_10br7neVIo9q4GInFKrEIHWDx5p5geiKeS6bd6IDa4uVDwXQwSm-Qp4GhkPnXA3J0FWlxtJyRDkR4fxove5EDHzAErH0zvMQEQltRdrhMxIkJCtyoK0W2RhuVTedjn-RkY5dwt-bUvcQqP8oDW36vcyFdl_a588Bfw2gHLhzWMU5GNsgliqeHATuDM9NezgjzhbkdAG1BZzfpiQ5s2PZZTPOtObHQWIB8TEqtrvlV7Mmm9CEVRWLB5f&src-supplier=Texas+Instruments, ComponentLink2URL=https://octopart.com:443/opatz8j6/c1?t=XjPZ95mwaTuyaopVPwYB-vAuTeLk9BdhXHpXRPpLoV7heq6jfKs6zbUbW_c3_E_s_SMPFwyFt2APWPIBGw399bfgzDnJc31p7RbXS8BrTcreve7C5jgqypnrERusi7yCRPQ7-IOmBrwl_10br7neVIo9q4GInFKrEIHWDx5p5geiKeS6bd6IDa4uVDwXQwSm-Qp4GhkPnXA3J0FWlxtJyRDkR4fxove5EDHzAErH0zvMQEQltRdrhMxIkJCtyoK0W2RhuVTedjn-RkY5dwt-bUvcQqP8oDW36vcyFdl_a588Bfw2gHLhzWMU5GNsgliqeHATuDM9NezgjzhbkdAG1BZzfpiQ5s2PZZTPOtObHQWIB8TEqtrvlV7Mmm9CEVRWLB5f&src-supplier=Texas+Instruments, ComponentLink3Description=https://sigma.octopart.com:443/49251900/technical_drawing/Texas-Instruments-LM1084ISX-3.3-NOPB.pdf?src-supplier=Texas+Instruments, ComponentLink3URL=https://sigma.octopart.com:443/49251900/technical_drawing/Texas-Instruments-LM1084ISX-3.3-NOPB.pdf?src-supplier=Texas+Instruments, ComponentLink4Description=https://datasheet.octopart.com:443/LM1084ISX-3.3-NOPB-Texas-Instruments-datasheet-14446412.pdf?src-supplier=Texas+Instruments, ComponentLink4URL=https://datasheet.octopart.com:443/LM1084ISX-3.3-NOPB-Texas-Instruments-datasheet-14446412.pdf?src-supplier=Texas+Instruments, ComponentLink5Description=https://datasheet.octopart.com:443/LM1084ISX-3.3/NOPB-Texas-Instruments-datasheet-10621405.pdf?src-supplier=Future+Electronics, ComponentLink5URL=https://datasheet.octopart.com:443/LM1084ISX-3.3/NOPB-Texas-Instruments-datasheet-10621405.pdf?src-supplier=Future+Electronics, ComponentLink6Description=https://datasheet.octopart.com:443/LM1084ISX-3.3/NOPB-National-Semiconductor-datasheet-659.pdf?src-supplier=Future+Electronics, ComponentLink6URL=https://datasheet.octopart.com:443/LM1084ISX-3.3/NOPB-National-Semiconductor-datasheet-659.pdf?src-supplier=Future+Electronics, ComponentLink7Description=https://datasheet.octopart.com:443/LM1084ISX-3.3-NOPB-Texas-Instruments-datasheet-163658313.pdf?src-supplier=Augswan, ComponentLink7URL=https://datasheet.octopart.com:443/LM1084ISX-3.3-NOPB-Texas-Instruments-datasheet-163658313.pdf?src-supplier=Augswan, ComponentLink8Description=https://datasheet.octopart.com:443/LM1084ISX-3.3-NOPB-Texas-Instruments-datasheet-165803946.pdf?src-supplier=LCSC, ComponentLink8URL=https://datasheet.octopart.com:443/LM1084ISX-3.3-NOPB-Texas-Instruments-datasheet-165803946.pdf?src-supplier=LCSC, ComponentLink9Description=http://sigma.octopart.com:80/reach_statement/Texas-Instruments-company-64.pdf?src-supplier=Compliance+Statements, ComponentLink9URL=http://sigma.octopart.com:80/reach_statement/Texas-Instruments-company-64.pdf?src-supplier=Compliance+Statements, ComponentLink10Description=http://sigma.octopart.com:80/conflict_mineral_statement/Texas-Instruments-company-63.pdf?src-supplier=Compliance+Statements, ComponentLink10URL=http://sigma.octopart.com:80/conflict_mineral_statement/Texas-Instruments-company-63.pdf?src-supplier=Compliance+Statements, Contact Plating=Tin, Height=4.83mm, Lead Free="Contains Lead", Length=10.18mm, Lifecycle Status=Production, Manufacturer Part Number=LM1084ISX-3.3/NOPB, Mounting Technology="Surface Mount", Number of Outputs=1, Number of Regulators=1, Output Current=5A, Output Type=Fixed, Packaging="Tape and Reel", Pins=3, Polarity=Positive, Power Dissipation=30W, Pricing="500=1.87148, 1000=1.81777, 1500=1.79088, 2500=1.76109, 3500=1.74368, 5000=1.72693 (USD)", Radiation Hardening=No, RoHS=Compliant, Schedule B="8542390000, 8542390000|8542390000|8542390000|8542390000|8542390000", Stock=2763, Supplier=DigiKey, Thickness=4.44mm, Width=8.41mm
J13 J14: "3.5 mm, Stereo, Right Angle, Mid Mount (SMT), Audio Jack Connector", Contact Resistance=50mΩ, Current Rating=1A, Insulation Color=Black, Insulation Resistance=100MΩ, Manufacturer="Same Sky", Max Operating Temperature=85°C, Min Operating Temperature=-25°C, Operating Force=29.4N, Supplier Part Number=CP-SJ2-35984B-SMT-CT-ND, Voltage Rating=12V, Category="Audio / Video Connectors", ComponentLink1Description=https://datasheet.octopart.com:443/SJ2-35984B-SMT-TR-CUI-Devices-datasheet-175925098.pdf?src-supplier=Same+Sky, ComponentLink1URL=https://datasheet.octopart.com:443/SJ2-35984B-SMT-TR-CUI-Devices-datasheet-175925098.pdf?src-supplier=Same+Sky, ComponentLink2Description=https://datasheet.octopart.com:443/SJ2-35984B-SMT-TR-CUI-Devices-datasheet-137945882.pdf?src-supplier=Same+Sky, ComponentLink2URL=https://datasheet.octopart.com:443/SJ2-35984B-SMT-TR-CUI-Devices-datasheet-137945882.pdf?src-supplier=Same+Sky, ComponentLink3Description=https://datasheet.octopart.com:443/SJ2-35984B-SMT-TR-CUI-Devices-datasheet-180438342.pdf?src-supplier=IHS, ComponentLink3URL=https://datasheet.octopart.com:443/SJ2-35984B-SMT-TR-CUI-Devices-datasheet-180438342.pdf?src-supplier=IHS, ComponentLink4Description=https://datasheet.octopart.com:443/SJ2-35984B-SMT-TR-Same-Sky-datasheet-187907005.pdf?src-supplier=Master+Electronics, ComponentLink4URL=https://datasheet.octopart.com:443/SJ2-35984B-SMT-TR-Same-Sky-datasheet-187907005.pdf?src-supplier=Master+Electronics, ComponentLink5Description=https://datasheet.octopart.com:443/SJ2-35984B-SMT-TR-CUI-Devices-datasheet-134028373.pdf?src-supplier=Master+Electronics, ComponentLink5URL=https://datasheet.octopart.com:443/SJ2-35984B-SMT-TR-CUI-Devices-datasheet-134028373.pdf?src-supplier=Master+Electronics, ComponentLink6Description=https://datasheet.octopart.com:443/SJ2-35984B-SMT-TR-CUI-Devices-datasheet-175926069.pdf?src-supplier=Electro+Sonic, ComponentLink6URL=https://datasheet.octopart.com:443/SJ2-35984B-SMT-TR-CUI-Devices-datasheet-175926069.pdf?src-supplier=Electro+Sonic, ComponentLink7Description=https://datasheet.octopart.com:443/SJ2-35984B-SMT-TR-CUI-Devices-datasheet-141002022.pdf?src-supplier=Electro+Sonic, ComponentLink7URL=https://datasheet.octopart.com:443/SJ2-35984B-SMT-TR-CUI-Devices-datasheet-141002022.pdf?src-supplier=Electro+Sonic, ComponentLink8Description=https://datasheet.octopart.com:443/SJ2-35984B-SMT-TR-CUI-Devices-datasheet-175927926.pdf?src-supplier=CUI+Devices+SCT, ComponentLink8URL=https://datasheet.octopart.com:443/SJ2-35984B-SMT-TR-CUI-Devices-datasheet-175927926.pdf?src-supplier=CUI+Devices+SCT, ComponentLink9Description=https://datasheet.octopart.com:443/SJ2-35984B-SMT-TR-CUI-Devices-datasheet-142371777.pdf?src-supplier=CUI+Devices+SCT, ComponentLink9URL=https://datasheet.octopart.com:443/SJ2-35984B-SMT-TR-CUI-Devices-datasheet-142371777.pdf?src-supplier=CUI+Devices+SCT, ComponentLink10Description=https://octopart.com:443/opatz8j6/c1?t=9mzVhao102gZ49KDDX11o2WVmCL86NuNv18NK088zXwEZH1BEGr11LhaeJvjcs1sLkYxic0-fk3ElnXueRGtBLPhc2EQ1yifZWCfQBVtm-fMwzsF-7J9CDU2Cy_9zF25QjYhtWO5HN1umGC9meNrbHDWbF_Dt-8PcdwuBD5Ye6A0c1UWyWad6_ZwouLczcJJu27XnMXNQ58_DNMJ7eOlXN8uU9LmPEjQV2RBspRCvZMpq8osm-okfb9m68yv1NN0jHAK_gzz_nJA8kKENSl38WH_8XEyVGbohUTXfP5saZjzuwr9D01N01M0u4N_sT2IcSv_xGneEsLwxwoGrNjSC0Xz1MnVo8tu8zJ79q022sGt&src-supplier=Compliance+Statements, ComponentLink10URL=https://octopart.com:443/opatz8j6/c1?t=9mzVhao102gZ49KDDX11o2WVmCL86NuNv18NK088zXwEZH1BEGr11LhaeJvjcs1sLkYxic0-fk3ElnXueRGtBLPhc2EQ1yifZWCfQBVtm-fMwzsF-7J9CDU2Cy_9zF25QjYhtWO5HN1umGC9meNrbHDWbF_Dt-8PcdwuBD5Ye6A0c1UWyWad6_ZwouLczcJJu27XnMXNQ58_DNMJ7eOlXN8uU9LmPEjQV2RBspRCvZMpq8osm-okfb9m68yv1NN0jHAK_gzz_nJA8kKENSl38WH_8XEyVGbohUTXfP5saZjzuwr9D01N01M0u4N_sT2IcSv_xGneEsLwxwoGrNjSC0Xz1MnVo8tu8zJ79q022sGt&src-supplier=Compliance+Statements, ComponentLink11Description=https://octopart.com:443/opatz8j6/c1?t=OwSjLi2Oa_AJ62IzMGgHdgT0fH4klHb0FaxsTBqQrP1GRWy2pAozO4zxE5y8spWpHIqt8XJw0w1QaEgUq55cqITjyes7cSYDU98XNin7IJa9XGt3viZrA9Z7ig2AagpQDv7RcnqJb7RURCd51uY0kA7yAYkPJKp6pTjPSxDCx7Ot3_YUSctPd8hDwx0lrhrcdqM61DplXdZd5UHW8V3K_NlrtekEZRG_Y2eK5-tqAtYClJTb0_MlIM8LmwncbO9HMNJaEBNRBW5yPUsaIrFeQK2bJO-c6pLPQOZa7s15sl-txdmSa4it7AHE7R-6QymQ2xAjo2A43czJjm5uwAtp0SAuDMWnnTlgeofBQzJlK9jN&src-supplier=Compliance+Statements, ComponentLink11URL=https://octopart.com:443/opatz8j6/c1?t=OwSjLi2Oa_AJ62IzMGgHdgT0fH4klHb0FaxsTBqQrP1GRWy2pAozO4zxE5y8spWpHIqt8XJw0w1QaEgUq55cqITjyes7cSYDU98XNin7IJa9XGt3viZrA9Z7ig2AagpQDv7RcnqJb7RURCd51uY0kA7yAYkPJKp6pTjPSxDCx7Ot3_YUSctPd8hDwx0lrhrcdqM61DplXdZd5UHW8V3K_NlrtekEZRG_Y2eK5-tqAtYClJTb0_MlIM8LmwncbO9HMNJaEBNRBW5yPUsaIrFeQK2bJO-c6pLPQOZa7s15sl-txdmSa4it7AHE7R-6QymQ2xAjo2A43czJjm5uwAtp0SAuDMWnnTlgeofBQzJlK9jN&src-supplier=Compliance+Statements, Export Control Classification Number (ECCN) Code=EAR99, Gender=Female, Harmonized Tariff Schedule (HTS) Code=8536.69.40.10, Introduction Date=2024-11-07, Lifecycle Status=Obsolete, Manufacturer Part Number=SJ2-35984B-SMT-TR, Mounting Technology="Surface Mount", Number of Conductors=4, Number of Poles=4, Number of Ports=1, Orientation="Right Angle", Pricing="1=1.43, 10=1.211, 25=1.1352, 50=1.081, 100=1.0293, 250=0.9648, 500=0.9187 (USD)", REACH SVHC=Yes, RoHS=Compliant, Shielding=Unshielded, Stock=954, Supplier=DigiKey
J15 J16: "MP Series 3.6 V 650 µA -26 dB Audio Sensor Omnidirectional Digital Microphone", Case/Package=LGA, Current=650µA, Frequency=2.4MHz, Manufacturer=STMicroelectronics, Manufacturer Package Identifier=HCLGA-DM00231908, Max Operating Temperature=85°C, Max Supply Voltage=3.6V, Min Operating Temperature=-40°C, Min Supply Voltage=1.6V, Operating Supply Voltage=1.8V, Power Supply Rejection Ratio (PSRR)=64dB, Supplier Part Number=497-17809-1-ND, Temperature Grade=Industrial, Body Material=Ceramic, Category=Microphones, China RoHS=Compliant, ComponentLink1Description=https://datasheet.octopart.com:443/MP34DT05TR-A-STMicroelectronics-datasheet-118180730.pdf?src-supplier=STMicroelectronics+SCT, ComponentLink1URL=https://datasheet.octopart.com:443/MP34DT05TR-A-STMicroelectronics-datasheet-118180730.pdf?src-supplier=STMicroelectronics+SCT, ComponentLink2Description=https://datasheet.octopart.com:443/MP34DT05TR-A-STMicroelectronics-datasheet-101522148.pdf?src-supplier=element14+APAC, ComponentLink2URL=https://datasheet.octopart.com:443/MP34DT05TR-A-STMicroelectronics-datasheet-101522148.pdf?src-supplier=element14+APAC, ComponentLink3Description=https://datasheet.octopart.com:443/MP34DT05TR-A-STMicroelectronics-datasheet-141402785.pdf?src-supplier=element14+APAC, ComponentLink3URL=https://datasheet.octopart.com:443/MP34DT05TR-A-STMicroelectronics-datasheet-141402785.pdf?src-supplier=element14+APAC, Country of Origin=Philippines, Export Control Classification Number (ECCN) Code=EAR99, Harmonized Tariff Schedule (HTS) Code=8542.39.00.60, Height=1.1mm, Height - Seated (Max)=1.1mm, Introduction Date=2017-07-26, Length=4mm, Lifecycle Status=Obsolete, LTB Date=2026-02-15, LTD Date=2026-08-15, Manufacturer Part Number=MP34DT05TR-A, Nominal Supply Current=650µA, Number of Circuits=1, Number of Terminals=4, Output Type=Digital, Packaging="Tape and Reel", Pricing="1=2.49, 10=1.892, 25=1.7044, 50=1.5776, 100=1.4624, 250=1.32556, 500=1.23248, 1000=1.14737 (USD)", REACH SVHC=Yes, RoHS=Compliant, Schedule B=8518100000, Signal to Noise Ratio (SNR)=64dB, Stock=39150, Supplier=DigiKey, Width=3mm